# Altium PCB NB2DSK01.PcbDoc (part 5 of 17)
Units mil, origin at the board's own origin, x right, y up, seen from the top; angles counter-clockwise.
Board outline 11815 x 6500.03 mil, 8 copper layers (Top Layer, MidLayer1, MidLayer2, GND, PWR, MidLayer3, MidLayer4, Bottom Layer), stack 74.62 mil thick; 798 components, 1002 nets, 3927 pads, 3182 vias.
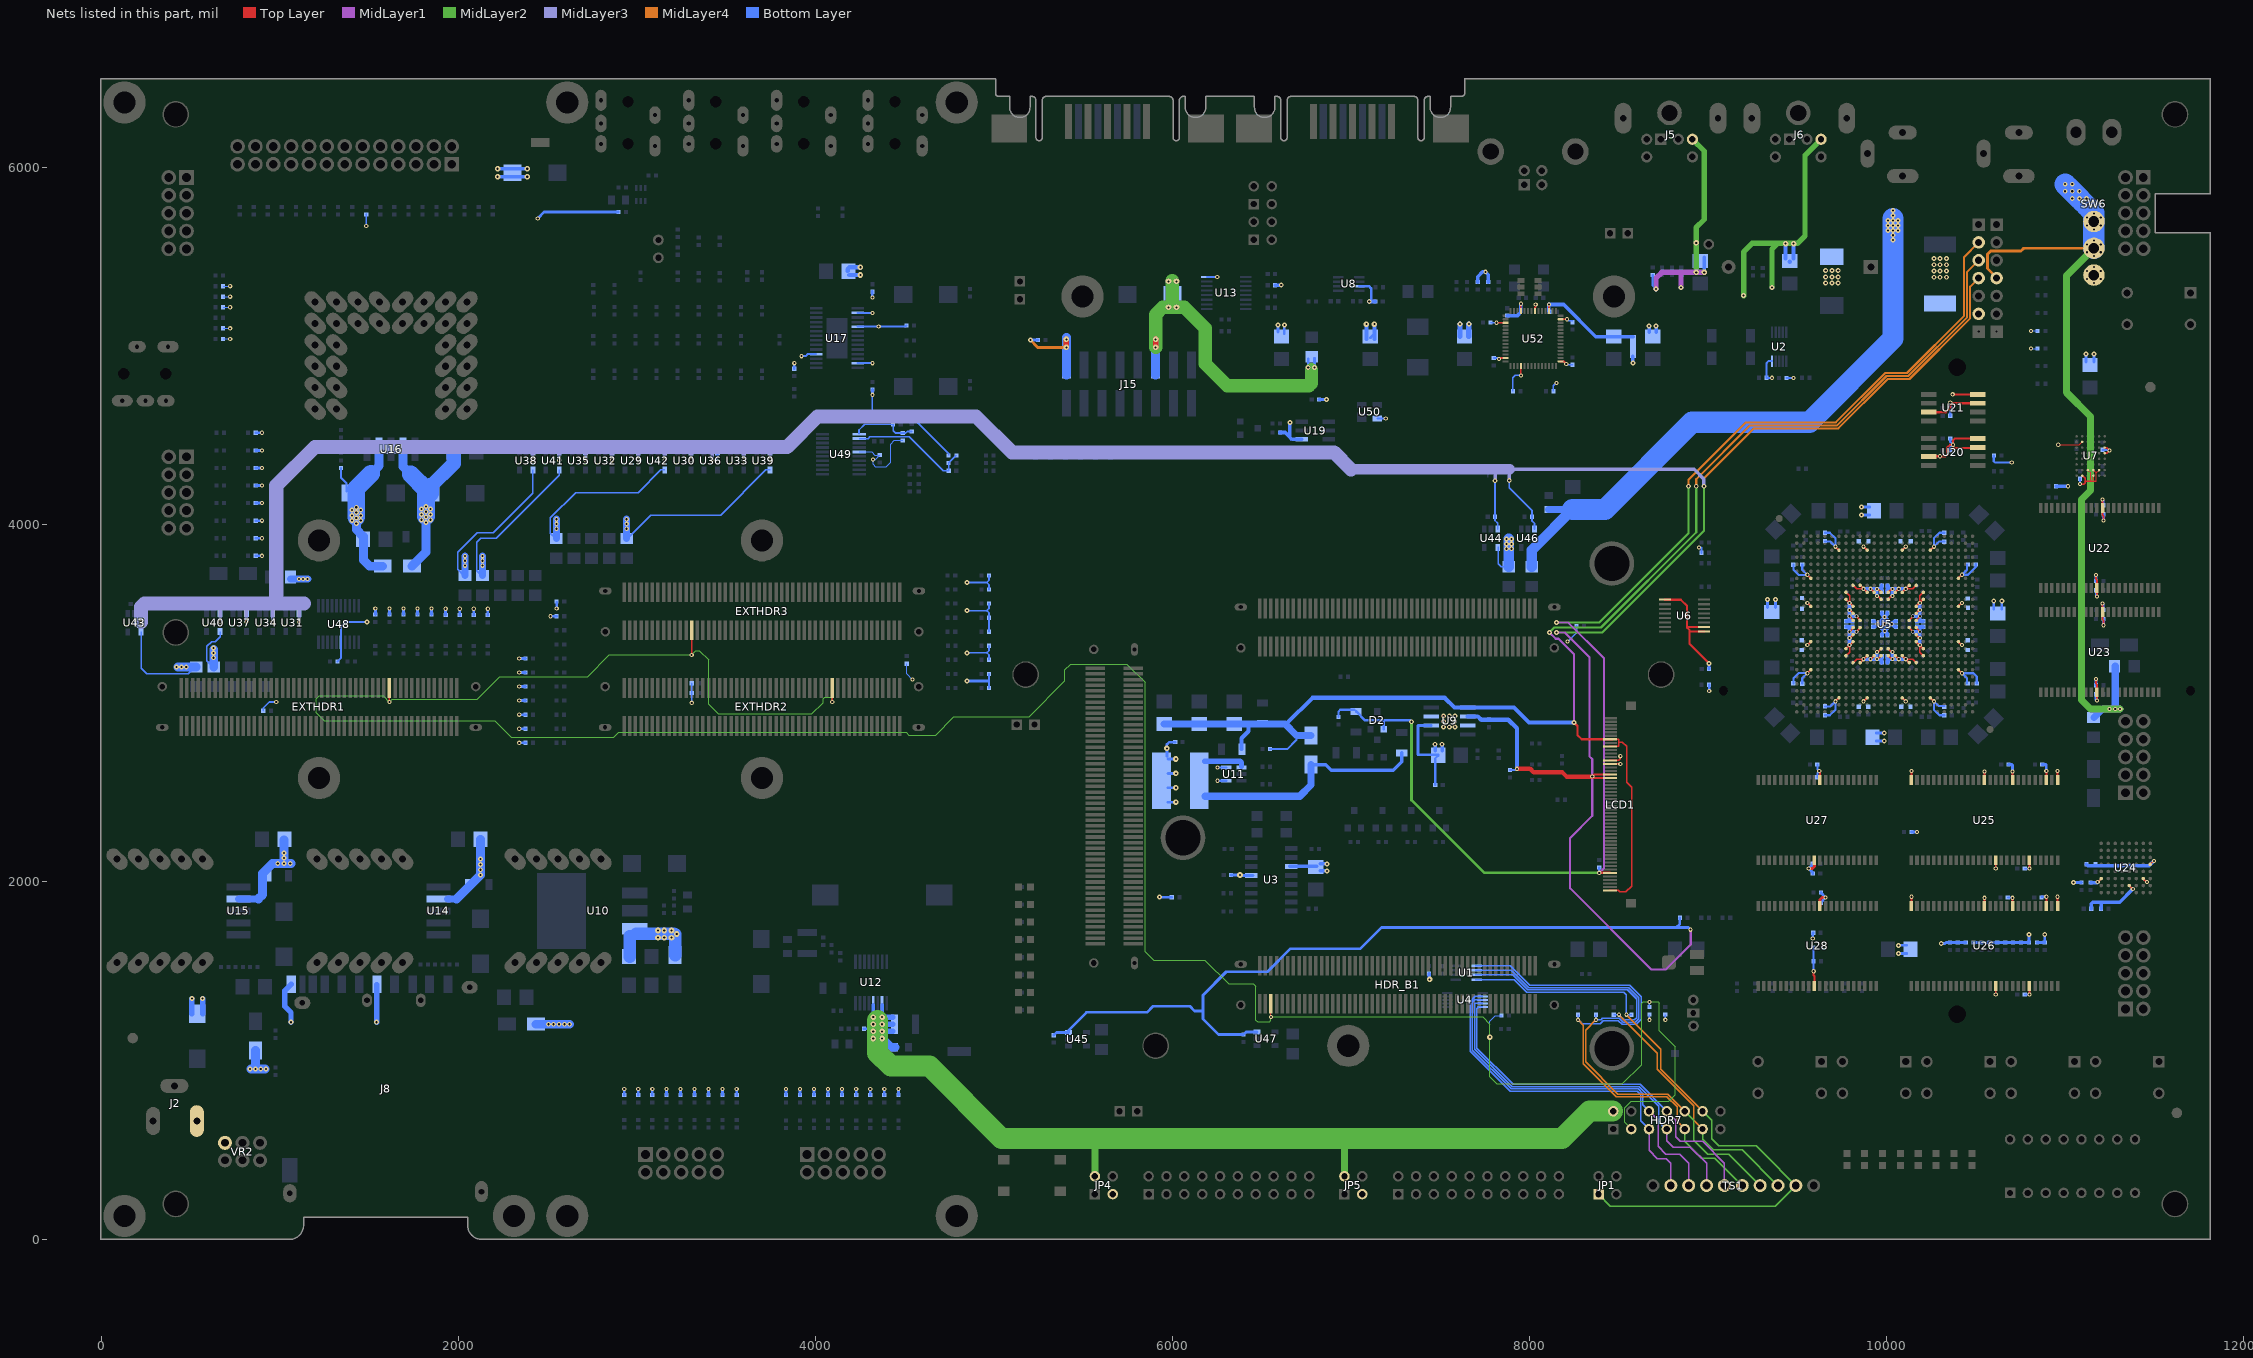
[diagram p11: the nets of this part, all layers, seen from the top]

## Via types
v1: diameter 23.62, hole 11.81, Top Layer to Bottom Layer, tented both sides, 1950 vias
v2: diameter 27.56, hole 11.81, Top Layer to Bottom Layer, tented both sides, 679 vias
v3: diameter 23.62, hole 11.81, Top Layer to Bottom Layer, 194 vias
v4: diameter 31.5, hole 11.81, Top Layer to Bottom Layer, tented both sides, 178 vias
v5: diameter 21.65, hole 11.81, Top Layer to Bottom Layer, tented both sides, 67 vias
v6: diameter 23.62, hole 11.81, Top Layer to Bottom Layer, tented bottom, 53 vias
v7: diameter 26, hole 11.81, Top Layer to Bottom Layer, tented both sides, 21 vias
v8: diameter 26, hole 11.81, Top Layer to Bottom Layer, 13 vias
v9: diameter 28, hole 11.81, Top Layer to Bottom Layer, 8 vias
v10: diameter 25.59, hole 11.81, Top Layer to Bottom Layer, tented both sides, 7 vias
v11: diameter 39.37, hole 11.81, Top Layer to Bottom Layer, tented both sides, 5 vias
v12: diameter 30, hole 11.81, Top Layer to Bottom Layer, 3 vias
v13: diameter 30, hole 11.81, Top Layer to Bottom Layer, tented both sides, 2 vias
v14: diameter 23, hole 11.81, Top Layer to Bottom Layer, tented both sides, 1 vias
v15: diameter 26.56, hole 11.81, Top Layer to Bottom Layer, tented both sides, 1 vias

## Nets (pads, with @x,y where several pads share a name; then routed paths per layer and width w, separated by ;. In a path a pad name is that pad's centre, name@x,y a point inside that pad or via, vN(x,y) a via of type N, cw(c..) or ccw(c..) an arc to the next point about the centre after c; other vN are vias at no path point) (continued)
3V3: C10.1 C11.1 C14.1 C15.1 C54.1 C55.1 C56.1 C57.1 C58.1 C59.1 C60.1 C61.1 C62.1 C63.1 C64.1 C65.1 C66.1 C67.1 C68.1 C69.1 C70.1 C71.1 C72.1 C73.1 C74.1 C75.1 C76.1 C77.1 C78.1 C79.1 C80.1 C81.1 C82.1 C83.1 C84.1 C85.1 C86.1 C87.1 C88.1 C89.1 C90.1 C91.1 C92.1 C93.1 C94.1 C95.1 C96.1 C97.1 C98.1 C99.1 C100.1 C101.1 C102.1 C103.1 C104.1 C105.1 C106.1 C107.1 C108.1 C109.1 C110.1 C111.1 C112.1 C113.1 C117.1 C121.1 C122.1 C123.1 C124.1 C125.1 C126.1 C154.1 C157.1 C158.1 C161.1 C162.1 C167.1 C168.1 C199.1 C200.2 C201.1 C202.2 C203.1 C204.1 C205.1 C206.1 C207.1 C208.1 C209.1 C210.1 C211.1 C212.1 C213.1 C214.1 C215.1 C216.1 C217.1 C218.1 C219.1 C220.1 C221.1 C222.1 C223.1 C224.1 C225.1 C226.1 C227.1 C228.1 C229.1 C230.1 C231.1 C232.1 C233.1 C234.1 C254.1 C255.1 C263.2 C264.2 C265.2 C266.1 C267.1 C268.1 D6.2 D7.2 D8.1 J8.4 J8.COM J15.16 JP4.3 JP5.3 LCD1.37 LCD1.38 NT5.1 R1.2 R6.1 R7.1 R10.2 R12.1 R18.2 R20.1 R34.2 R47.2 R52.1 R79.2 R135.2 R137.2 R142.2 R143.2 R144.2 R145.2 R146.2 R147.2 R148.2 R149.2 R150.2 R151.2 R152.2 R153.1 R154.1 R155.2 R156.1 R157.2 R158.1 R159.1 R160.2 R171.1 R172.1 R173.1 R177.1 R183.2 R190.2 R191.2 R192.2 R193.2 R198.2 R199.2 R200.2 R201.2 R206.2 R208.2 R209.2 R210.2 R211.2 R216.2 R217.2 R218.2 R219.2 R224.2 R226.2 R227.2 R228.2 R229.2 R234.2 R235.2 R236.2 R237.2 R242.2 R244.2 R245.2 R246.2 R247.2 R252.2 R253.2 R254.2 R255.2 R260.2 R262.2 R263.2 R264.2 R265.2 R270.2 R271.2 R272.2 R273.2 R278.2 R280.2 R281.2 R282.2 R283.2 R288.2 R289.2 R290.2 R291.2 R296.1 R297.2 R298.2 R299.2 R300.2 R303.1 R304.1 R314.2 R316.2 R318.1 R319.1 TP12.1 U2.10 U3.3 U3.13 U5.AD7 U5.AD11 U5.AD16 U5.AD20 U5.C7 U5.C11 U5.C16 U5.C20 U5.G3 U5.G24 U5.H9 U5.H10 U5.H17 U5.H18 U5.J8 U5.J11 U5.J12 U5.J13 U5.J14 U5.J15 U5.J16 U5.J19 U5.K8 U5.K13 U5.K14 U5.K19 U5.L3 U5.L9 U5.L18 U5.L24 U5.M9 U5.M18 U5.N9 U5.N10 U5.N17 U5.N18 U5.P9 U5.P10 U5.P17 U5.P18 U5.R9 U5.R18 U5.T3 U5.T9 U5.T18 U5.T24 U5.U8 U5.U13 U5.U14 U5.U19 U5.V8 U5.V11 U5.V12 U5.V13 U5.V14 U5.V15 U5.V16 U5.V19 U5.W9 U5.W10 U5.W17 U5.W18 U5.Y3 U5.Y24 U6.1 U6.9 U6.10 U7.B2 U7.C6 U7.D6 U7.G3 U7.G4 U7.G5 U7.H2 U7.H4 U8.3 U13.16 U14.2 U15.2 U16.4 U19.4 U20.3 U20.7 U20.8 U21.3 U21.7 U21.8 U22.11 U22.33 U23.11 U23.33 U24.D8 U24.F1 U24.F7 U24.G5 U25.1 U25.3 U25.9 U25.14 U25.27 U25.43 U25.49 U26.1 U26.3 U26.9 U26.14 U26.27 U26.43 U26.49 U27.11 U27.33 U28.11 U28.33 U38.4 U39.4 U40.4 U44.4 U48.15 U49.15 U50.4 U52.7 U52.11 U52.17 U52.27 U52.32 U52.43 U52.55 | length 26546.1
  Top Layer w5: v1(10960.63,4448.82) 11078.74,4448.82 U7.B2@11094.49,4464.57 ; U7.G3@11125.98,4307.09 11141.73,4291.34 11141.73,4244.1 ; 11157.48,4246.62 U7.H4@11157.48,4275.59 ; U7.G4@11157.48,4307.09 11173.23,4291.34 ; 11173.23,4244.1 11173.23,4291.34 ; U7.G5@11188.98,4307.09 11173.23,4291.34
  Top Layer w7.87: v1(7950.79,4836.61) U52.32@7950.79,4885.24 ; U52.55@8177.76,5151.57 v1(8208.68,5151.57) ; LCD1.37@8448.82,2661.42 v1(8507.87,2661.42) ; LCD1.38@8448.82,2681.1 8500,2681.1 8507.87,2688.98 v1(8507.87,2704.73) ; 8803.15,3581.06 8846.46,3581.06 ; v1(9555.12,3169.29) U5.Y3@9574.8,3188.98 ; v1(9555.12,3326.77) U5.T3@9574.8,3346.46 ; v1(9555.12,3562.99) U5.L3@9574.8,3543.31 ; v1(9555.12,3720.47) U5.G3@9574.8,3700.79 ; v1(9712.6,3011.81) U5.AD7@9732.28,3031.5 ; v1(9712.6,3877.95) U5.C7@9732.28,3858.27 ; U5.V8@9771.65,3267.72 9791.34,3287.4 v1(9791.34,3326.77) ; U5.U8@9771.65,3307.09 v1(9791.34,3326.77) ; U5.K8@9771.65,3582.68 v1(9791.34,3562.99) ; U5.J8@9771.65,3622.05 9791.34,3602.36 v1(9791.34,3562.99) ; v1(9791.34,3366.14) U5.R9@9811.02,3385.83 ; v5@9791.34,3402.76 U5.P9@9811.02,3425.2 ; v5@9791.34,3487.01 U5.N9@9811.02,3464.57 ; v1(9791.34,3523.62) U5.M9@9811.02,3503.94 ; U5.W9@9811.02,3228.35 9830.71,3248.03 v1(9870.08,3248.03) ; U5.T9@9811.02,3346.46 v1(9791.34,3326.77) ; U5.L9@9811.02,3543.31 v1(9791.34,3562.99) ; U5.H9@9811.02,3661.42 9830.71,3641.73 v1(9870.08,3641.73) ; v5@9830.71,3403.15 U5.P10@9850.39,3425.2 ; v5@9830.71,3486.62 U5.N10@9850.39,3464.57 ; U5.W10@9850.39,3228.35 v1(9870.08,3248.03) ; U5.H10@9850.39,3661.42 v1(9870.08,3641.73) ; v1(9870.08,3011.81) U5.AD11@9889.76,3031.5 ; v1(9870.08,3877.95) U5.C11@9889.76,3858.27 ; U5.V11@9889.76,3267.72 v1(9870.08,3248.03) ; U5.J11@9889.76,3622.05 v1(9870.08,3641.73) ; v1(9909.45,3248.03) U5.V12@9929.13,3267.72 ; v1(9909.45,3641.73) U5.J12@9929.13,3622.05 ; v5@9948.82,3248.03 U5.V13@9968.5,3267.72 ; v5@9948.82,3287.4 U5.U13@9968.5,3307.09 ; v5@9948.82,3602.36 U5.K13@9968.5,3582.68 ; v5@9948.82,3641.73 U5.J13@9968.5,3622.05 ; U5.V14@10007.87,3267.72 v5@10027.56,3248.03 ; U5.U14@10007.87,3307.09 v5@10027.56,3287.4 ; U5.K14@10007.87,3582.68 v5@10027.56,3602.36 ; U5.J14@10007.87,3622.05 v5@10027.56,3641.73 ; U5.V15@10047.24,3267.72 v1(10066.93,3248.03) ; U5.J15@10047.24,3622.05 v1(10066.93,3641.73) ; U5.AD16@10086.61,3031.5 v1(10106.3,3011.81) ; U5.V16@10086.61,3267.72 v1(10106.3,3248.03) ; U5.J16@10086.61,3622.05 v1(10106.3,3641.73) ; U5.C16@10086.61,3858.27 v1(10106.3,3877.95) ; U5.W17@10125.98,3228.35 v1(10106.3,3248.03) ; U5.P17@10125.98,3425.2 v5@10145.67,3405.51 ; U5.N17@10125.98,3464.57 v5@10145.67,3484.25 ; U5.H17@10125.98,3661.42 v1(10106.3,3641.73) ; U5.W18@10165.35,3228.35 10145.67,3248.03 v1(10106.3,3248.03) ; U5.T18@10165.35,3346.46 v1(10185.04,3326.77) ; U5.R18@10165.35,3385.83 v1(10185.04,3366.14) ; U5.P18@10165.35,3425.2 v5@10185.04,3405.51 ; U5.N18@10165.35,3464.57 v5@10185.04,3485.83 ; U5.M18@10165.35,3503.94 v1(10185.04,3523.62) ; U5.L18@10165.35,3543.31 v1(10185.04,3562.99) ; U5.H18@10165.35,3661.42 10145.67,3641.73 v1(10106.3,3641.73) ; U5.V19@10204.72,3267.72 10185.04,3287.4 v1(10185.04,3326.77) ; U5.U19@10204.72,3307.09 v1(10185.04,3326.77) ; U5.K19@10204.72,3582.68 v1(10185.04,3562.99) ; U5.J19@10204.72,3622.05 10185.04,3602.36 v1(10185.04,3562.99) ; U5.AD20@10244.09,3031.5 v1(10263.78,3011.81) ; U5.C20@10244.09,3858.27 v1(10263.78,3877.95) ; U5.Y24@10401.58,3188.98 v1(10421.26,3169.29) ; U5.T24@10401.58,3346.46 v1(10421.26,3326.77) ; U5.L24@10401.58,3543.31 v1(10421.26,3562.99) ; U5.G24@10401.58,3700.79 v1(10421.26,3720.47) ; v1(11082.68,4228.35) 11102.36,4228.35 11110.24,4236.22 11110.24,4240.24 11110.24,4259.84 U7.H2@11094.49,4275.59 ; v1(11181.1,1999.82) U24.F1@11200.79,2019.51 ; U7.D6@11220.47,4401.58 11232.28,4401.58 v1(11248.03,4417.32) 11232.28,4433.07 U7.C6@11220.47,4433.07 ; U24.G5@11358.27,1980.14 v1(11377.95,1960.45) ; U24.F7@11437.01,2019.51 v1(11456.69,1999.82) ; U24.D8@11476.38,2098.25 v1(11496.06,2117.93)
  Top Layer w8: 11110,4240 11110.24,4240.24 11114.1,4244.1 11141.73,4244.1 11173.23,4244.1
  Top Layer w9.84: U52.11@7950.79,5193.9 U52.11@7950.78,5197.78 v1(7950.79,5238.19) ; U52.43@8173.01,4915.5 U52.43@8174.01,4915.5 8190.8,4915.5 v1(8204.72,4901.58) ; U26.14@10547.25,1866.14 v1(10547.24,1911.42) ; U25.14@10547.25,2570.87 v1(10547.24,2618.11) ; v1(10610.24,1370.08) U26.43@10610.24,1417.32 ; v1(10610.24,2074.8) U25.43@10610.24,2122.05 ; U26.9@10704.73,1866.14 v1(10704.72,1911.42) ; U25.9@10704.73,2570.87 v1(10704.72,2618.11) ; v1(10799.21,1370.08) U26.49@10799.21,1417.32 ; v1(10799.21,2074.8) U25.49@10799.21,2122.05 ; v1(11177.17,3015.75) U23.11@11177.17,3062.99 11177.17,3106.69 11172.24,3111.61 v1(11172.24,3136.81) v1@11177.17,3131.89 ; v1(11177.17,3598.43) U22.11@11177.17,3645.67 11177.17,3691.39 11172.24,3696.31 v1(11172.24,3719.49) v1@11177.17,3714.57 ; v1@11208.66,3442.91 v1(11213.58,3437.99) 11213.58,3463.86 11208.66,3468.78 U23.33@11208.66,3511.81 v1(11208.66,3559.06) ; v1(11208.66,4141.73) U22.33@11208.66,4094.49 11208.66,4054.11 11213.58,4049.19 v1(11213.58,4024.61)
  Top Layer w10: v1(7813.68,5131.89) U52.17@7861.61,5131.89 ; v1(7828.68,4928.45) 7835.41,4935.19 U52.27@7865.35,4935.19 ; U52.7@8029.52,5197.78 8029.52,5217.52 8033.68,5221.68 v1(8033.68,5233.45)
  Top Layer w11.81: v1(9590.55,1500.14) 9590.55,1477.45 9594.49,1473.51 U28.33@9594.49,1417.32 ; v1(9622.05,2622.05) 9625.98,2618.11 U27.11@9625.98,2570.87 ; U26.27@10137.8,1866.14 v1(10137.8,1917.32) ; U25.27@10137.8,2570.87 v1(10137.8,2622.05) ; U20.3@10208.66,4384.65 10234.25,4384.65 v1(10297.64,4384.65) 10328.65,4384.65 10339,4395 10339,4433 10354.82,4448.82 v1(10371.06,4448.82) ; U26.3@10893.7,1866.14 v1(10893.7,1917.32) ; U25.3@10893.7,2570.87 v1(10893.7,2622.05) ; U26.1@10956.69,1866.14 v1(10956.69,1917.32) ; U25.1@10956.69,2570.87 v1(10956.69,2622.05)
  Top Layer w12: U6.1@8757.87,3581.06 8846.46,3581.06 8881.89,3545.63 8881.89,3423.11 ; 8895,3410 8895,3333.51 v2(9004.92,3223.58) ; U6.9@8976.38,3401.93 8903.07,3401.93 8881.89,3423.11 ; U6.10@8976.38,3427.52 8886.3,3427.52 8881.89,3423.11 ; U21.3@10234.25,4631.1 10332.1,4631.1 10356,4655 v1@10356,4684.36 ; v1(10355.32,4685.04) v1@10356,4684.36 ; v1(10369.1,4731.1) U21.8@10509.84,4731.1 ; U20.8@10509.84,4483.07 10381.07,4483.07 10371.06,4473.06 v1(10371.06,4448.82) 10371.06,4439.94 10381,4430 10509.84,4430 U20.7@10510,4430 ; U21.7@10509.84,4681.1 10359.25,4681.1 v1@10356,4684.36
  Top Layer w15.75: v1(9562.99,2074.8) 9582.68,2074.8 9594.49,2086.62 U27.33@9594.49,2122.05 ; U28.11@9625.98,1866.14 9625.98,1901.57 9637.8,1913.39 v1(9657.48,1913.39)
  Top Layer w30: v4(5405.51,4994.27) v4(5405.51,5039.19)
  MidLayer1 w30: v4(5405.51,4994.27) v4(5405.51,5039.19)
  MidLayer2 w30: v4(5405.51,4994.27) v4(5405.51,5039.19)
  MidLayer4 w15.75: v2(5204.2,5035.42) 5245.35,4994.27 v4(5405.51,4994.27)
  MidLayer4 w30: v4(5405.51,4994.27) v4(5405.51,5039.19)
  MidLayer3 w30: v4(5405.51,4994.27) v4(5405.51,5039.19)
  Bottom Layer w5: R300.2@682.6,5041.73 v1(722.36,5041.73) ; R299.2@682.6,5100.79 v1(722.36,5100.79) ; R298.2@682.6,5218.9 v1(722.36,5218.9) ; R297.2@682.6,5277.95 v1(722.36,5277.95) ; R296.1@682.6,5337.01 v1(722.36,5337.01) ; v1(10808,4987.57) R304.1@10845.4,4987.57 ; v1(10808,5086) R303.1@10845.4,5086
  Bottom Layer w7: U49.15@4244.37,4408.46 4315.94,4408.46 4333.66,4390.75 C254.1@4360.24,4390.75 4335.63,4366.14 v1(4322.83,4366.14) 4322.83,4338.58 4334.65,4326.77 4397.64,4326.77 4421.26,4350.39 4421.26,4452.76 4441.12,4472.62 R183.2@4489.11,4472.62 ; R144.2@4511.81,3222.3 4511.81,3165.35 v1(4543.31,3133.86)
  Bottom Layer w7.87: R173.1@625.98,3204.72 591.61,3239.09 591.61,3319.96 618.11,3346.46 637.8,3346.46 665.55,3374.21 U40.4@665.55,3401.94 ; U48.15@1342.4,3342.34 U48.15@1342.5,3342.24 ; R34.2@1482.28,5742.13 1484.25,5740.16 R34.2@1484.25,5738.66 v1@1484.25,5677.17 ; R171.1@2035.43,3712.6 2034.45,3713.58 1996.06,3751.97 1996.06,3846.46 2106.3,3956.69 2196.85,3956.69 2417.52,4177.36 U38.4@2417.52,4307.45 ; R172.1@2944.88,3921.26 3078.74,4055.12 3468.5,4055.12 3720.83,4307.45 U39.4@3746.26,4307.45 ; U44.4@7822.83,3877.95 7822.83,3874.38 7822.83,3783.46 7840.55,3765.75 R177.1@7883.86,3765.75 ; R316.2@7905.98,4748.03 7905.98,4823.31 7919.29,4836.61 v1(7950.79,4836.61) ; R314.2@8133.39,4748.03 8133.39,4779.05 v1(8149.61,4795.28) ; v1(8670.97,1228.01) R6.1@8670.97,1256.86 ; v1(8759.97,1228.01) R7.1@8759.97,1256.86 ; v5@10145.67,3404.33 v5@10145.67,3405.51 ; C95.1@10166.34,3429.13 C95.1@10169.29,3429.13 10203.69,3429.13 C58.1@10204.01,3429.45
  Bottom Layer w9.84: R142.2@907.5,2958.45 907.5,2974.43 940.94,3007.87 v1(980.32,3007.87) ; v1(3307.5,3003.45) R20.1@3307.5,3058.45 R143.2@3307.5,3113.45 ; v2(4849.58,3283.44) 4959.61,3283.44 ; v2(4849.58,3519.66) 4959.61,3519.66 ; v2(4849.58,3677.14) 4959.61,3677.14 ; R209.2@4971.97,3086.61 R208.2@4971.97,3165.35 ; R211.2@4971.97,3244.1 4971.97,3271.13 4959.64,3283.47 4971.97,3295.8 R210.2@4971.97,3322.84 ; R216.2@4971.97,3401.58 R217.2@4971.97,3480.32 4971.97,3507.35 4959.64,3519.69 4971.97,3532.02 R219.2@4971.97,3559.06 ; R218.2@4971.97,3637.8 4971.97,3664.83 4959.64,3677.17 4971.97,3689.5 R224.2@4971.97,3716.54 ; v1(8204.72,4901.58) 8209.65,4896.65 C264.2@8240.16,4896.65 ; v1(8208.68,5151.57) 8217.54,5142.72 C265.2@8240.16,5142.72 ; v1(8212.6,3346.46) 8262.5,3396.36 R18.2@8262.5,3433.45 ; v1@10355.32,4684.06 v1(10355.32,4685.04) ; C222.1@10772.64,1370.08 v1(10799.21,1370.08) ; C220.1@10772.64,2074.8 v1(10799.21,2074.8) ; v1(11208.66,4141.73) 11213.58,4136.81 C207.1@11213.58,4110.24
  Bottom Layer w10: C267.1@7782.48,5131.89 v1(7813.68,5131.89) ; C268.1@7799.21,4934.06 7823.08,4934.06 v1(7828.68,4928.45)
  Bottom Layer w11.81: U50.4@7146.86,4596.13 v1(7194.1,4596.13) ; v1(8949,3872.8) 8960,3872.8 8962.1,3870.7 R159.1@8962.1,3843.38 ; v1(9356.91,4823.54) C11.1@9326.4,4823.54 ; U2.10@9358.29,4916.76 9336.99,4916.76 9326.4,4906.17 ; R1.2@9438.61,4823 R1.2@9439.13,4823 v1(9477,4823) ; C233.1@9589.57,1631.93 C229.1@9589.57,1556.18 ; v1(9590.55,1500.14) 9589.57,1501.13 C229.1@9589.57,1556.18 ; C229.1@9590.55,1555.19 C229.1@9589.57,1556.18 ; C232.1@9611.22,2586.61 9611.22,2609.25 9622.05,2620.08 v1(9622.05,2622.05) 9611.22,2632.87 C228.1@9611.22,2657.48 ; C199.1@10355.32,4417.32 10355.32,4435.04 10369.09,4448.82 v1(10371.06,4448.82) 10355.32,4464.57 C202.2@10355.32,4484.25 ; C200.2@10355.29,4611.45 C201.1@10355.32,4654.74 v1(10355.32,4685.04) ; C221.1@10678.15,1913.39 v1@10702.76,1913.39 ; C225.1@10866.14,1917.32 10867.13,1917.32 v1(10893.7,1917.32) ; v1(11082.68,4228.35) C121.1@11082.68,4258.86 ; C204.1@11172.24,3633.86 11172.24,3603.35 v1(11177.17,3598.43) ; v1(11208.66,3559.06) 11213.58,3554.13 C208.1@11213.58,3523.62 ; C122.1@11208.66,4420.28 11245.08,4420.28 v1(11248.03,4417.32) ; C11.1@9326.4,4823.54 9326.4,4906.17 ; C11.1@9326.4,4823.54 9326.4,4906.17
  Bottom Layer w12: C255.1@1322.76,3234.1 1342.5,3253.83 U48.15@1342.5,3342.24 1342.5,3429.5 1370,3457 v2(1489,3457) ; R79.2@1343.68,4318.67 1343.68,4262.92 1374.7,4231.9 C168.1@1374.7,4188.5 ; U13.16@6192.59,5388.78 v1(6250.66,5388.78) ; C75.1@9476.76,3113.03 9476.77,3139.94 9508.08,3171.26 v1@9555.12,3171.26 ; C106.1@9476.76,3776.74 9476.76,3749.83 9508.08,3718.51 v1@9555.12,3718.51 ; C98.1@9526.97,3110.91 9526.97,3141.14 v1(9555.12,3169.29) ; C80.1@9526.97,3778.86 9526.97,3748.62 v1(9555.12,3720.47) ; C81.1@9654.21,2983.66 9684.45,2983.66 v1(9712.6,3011.81) 9712.6,2964.77 9681.28,2933.45 C99.1@9654.37,2933.45 ; C78.1@9654.21,3906.1 9654.35,3906.1 9684.45,3906.1 v1(9712.6,3877.95) 9712.6,3925 9681.28,3956.31 C89.1@9654.37,3956.31 ; C88.1@10322.01,2933.45 10295.1,2933.45 10263.78,2964.77 v1(10263.78,3011.81) 10290.75,2984.84 10322.01,2984.84 C70.1@10322.17,2984.84 ; C87.1@10322.01,3956.31 10295.1,3956.31 10263.78,3925 v1(10263.78,3877.95) 10291.93,3906.1 C79.1@10322.17,3906.1 ; C69.1@10449.41,3110.91 10449.41,3111.12 10449.41,3141.14 v1(10421.26,3169.29) 10485.57,3169.29 10503.94,3150.92 C108.1@10503.94,3111.22 ; C73.1@10449.41,3778.86 10449.41,3778.78 10449.41,3748.62 v1(10421.26,3720.47) 10454.72,3720.47 10498.68,3764.43 C101.1@10498.68,3778.78 C101.1@10498.68,3779.25 ; R52.1@10599.28,4388.25 10599.28,4356.72 10606,4350 v1(10700,4350)
  Bottom Layer w14: U8.3@7045.11,5336.69 7099.93,5336.69 7112.33,5324.29 7112.33,5261.76 v2(7101.62,5251.06)
  Bottom Layer w15: v2(4849.58,3125.96) 4969.46,3125.96
  Bottom Layer w15.75: R290.2@865.67,3826.77 v1(900.12,3826.77) ; R291.2@865.67,3925.2 v1(900.12,3925.2) ; R289.2@865.67,4023.62 v1(900.12,4023.62) ; R288.2@865.67,4122.05 v1(900.12,4122.05) ; R283.2@865.67,4220.47 v1(900.12,4220.47) ; R282.2@865.67,4318.9 v1(900.12,4318.9) ; R280.2@865.67,4417.32 v1(900.12,4417.32) ; R281.2@865.67,4515.75 v1(900.12,4515.75) ; R206.2@1535.43,3497.56 v1(1535.43,3532.01) ; R200.2@1614.17,3497.56 v1(1614.17,3532.01) ; R201.2@1692.91,3497.56 v1(1692.91,3532.01) ; R199.2@1771.65,3497.56 v1(1771.65,3532.01) ; R198.2@1850.39,3497.56 v1(1850.39,3532.01) ; R192.2@1929.13,3495.59 v1(1929.13,3530.04) ; R193.2@2007.87,3495.59 v1(2007.87,3530.04) ; R190.2@2086.61,3495.59 v1(2086.61,3530.04) ; R191.2@2165.35,3495.59 v1(2165.35,3530.04) ; v1(2341.61,2779.53) R242.2@2376.06,2779.53 ; v1(2341.61,2858.27) R236.2@2376.06,2858.27 ; v1(2341.61,2937.01) R237.2@2376.06,2937.01 ; v1(2341.61,3015.75) R235.2@2376.06,3015.75 ; v1(2341.61,3094.49) R234.2@2376.06,3094.49 ; v1(2341.61,3173.23) R228.2@2376.06,3173.23 ; v1(2341.61,3251.97) R229.2@2376.06,3251.97 ; v1(2444.88,5716.54) 2480.32,5751.97 R135.2@2896.14,5751.97 ; v1(2516.42,3488.19) R227.2@2550.87,3488.19 ; v1(2550.87,3532.48) R226.2@2550.87,3566.93 ; R245.2@2929.13,806.61 v1(2929.13,841.06) ; R244.2@3007.87,806.61 v1(3007.87,841.06) ; R247.2@3086.61,806.61 v1(3086.61,841.06) ; R246.2@3165.35,806.61 v1(3165.35,841.06) ; R252.2@3244.09,806.61 v1(3244.09,841.06) ; R253.2@3322.83,806.61 v1(3322.83,841.06) ; R255.2@3401.57,806.61 v1(3401.57,841.06) ; R254.2@3480.32,806.61 v1(3480.32,841.06) ; R260.2@3559.06,806.61 v1(3559.06,841.06) ; R263.2@3834.65,806.61 v1(3834.65,841.06) ; R262.2@3913.39,806.61 v1(3913.39,841.06) ; R265.2@3992.13,806.61 v1(3992.13,841.06) ; R264.2@4070.87,806.61 v1(4070.87,841.06) ; R270.2@4149.61,806.61 v1(4149.61,841.06) ; R271.2@4228.35,806.61 v1(4228.35,841.06) ; R273.2@4307.09,806.61 v1(4307.09,841.06) ; R272.2@4385.83,806.61 v1(4385.83,841.06) ; R278.2@4464.57,806.61 v1(4464.57,841.06) ; v2@5200.26,5035.42 v2(5204.2,5035.42) R137.2@5246.52,5035.42 ; v2(5927.84,1915) R158.1@5995.64,1915 ; C14.1@6327.76,2039.37 v4@6374.02,2039.37 ; v4(6377.95,2039.37) v4@6374.02,2039.37 ; U3.13@6450.79,2037.01 U3.13@6440.95,2037.01 6377.95,2037.01 6376.38,2037.01 6375.98,2037.4 v4@6374.02,2039.37 ; C123.1@6590.61,5079.36 v2(6590.61,5118.73) ; C123.1@6626.05,5071.48 v2(6626.05,5118.73) ; C125.1@6820.68,4702 v2(6863,4702) ; C124.1@7107.83,5047.86 7111.76,5051.8 C124.1@7127.51,5067.55 ; C117.1@9004.92,3192.91 v2(9004.92,3223.58) ; v1(9005.4,3070.4) R47.2@9005.4,3104.85 ; C57.1@9332.73,3536.55 v2(9332.73,3581.55) ; C57.1@9377.73,3536.55 v2(9377.73,3581.55) ; v1(9585.33,1683.84) 9585.33,1712.38 C226.1@9588.28,1715.33 ; C231.1@9585.63,2047.24 9585.63,2052.17 v1(9562.99,2074.8) 9585.63,2097.44 C227.1@9585.63,2102.36 ; C234.1@9630.91,1881.89 9630.91,1886.81 v1(9657.48,1913.39) 9630.91,1939.96 C230.1@9630.91,1940.95 ; v2(9859.48,4055.87) C56.1@9904.48,4055.87 ; v2(9859.48,4100.87) C56.1@9904.48,4100.87 ; C54.1@9941,2788.98 v2(9986,2788.98) ; C54.1@9941,2833.98 v2(9986,2833.98) ; v2(10066.54,1600.28) C218.1@10111.54,1600.28 ; v2(10066.54,1645.28) C218.1@10111.54,1645.28 ; C224.1@10138.89,2280.7 v1(10169.4,2280.7) ; v2(10305,1655) 10327,1655 10332.48,1660.48 R153.1@10353.41,1660.48 R155.2@10441.99,1660.48 ; R145.2@10486.28,1660.48 R146.2@10530.57,1660.48 R147.2@10574.86,1660.48 R148.2@10619.15,1660.48 R149.2@10663.44,1660.48 R150.2@10707.73,1660.48 R151.2@10752.03,1660.48 R152.2@10796.32,1660.48 v2(10796.32,1706.14) ; C55.1@10599.19,3528.68 v2(10599.19,3573.68) ; C55.1@10644.19,3528.68 v2(10644.19,3573.68) ; C219.1@10682.09,2656.5 C219.1@10682.09,2657.48 10701.48,2657.48 10704.72,2654.24 v1(10704.72,2618.11) ; R156.1@10840.61,1660.48 R157.2@10884.9,1660.48 v2(10884.9,1706.14) ; C223.1@10871.06,2657.48 10890.46,2657.48 10893.7,2654.24 v1(10893.7,2622.05) ; v2(11044.88,1996.87) C212.1@11090.55,1996.87 ; C217.1@11116,4913 v2(11116,4958) ; C217.1@11161,4913 v2(11161,4958) ; C210.1@11172.24,3102.36 v1(11172.24,3136.81) ; C209.1@11172.24,3685.04 v1(11172.24,3719.49) ; C206.1@11173.23,3050.2 C206.1@11172.24,3051.18 11172.24,3020.67 v1(11177.17,3015.75) ; v1(11213.58,3437.99) C205.1@11213.58,3472.44 ; v1(11213.58,4024.61) C203.1@11213.58,4059.06
  Bottom Layer w19.68: U3.3@6655.51,2087.01 U3.3@6665.35,2087.01 6801.5,2087.01 C15.1@6808.66,2087.01 ; C15.1@6828.7,2061.9 v2(6864.13,2061.9) ; C15.1@6828.7,2101.27 v2(6864.13,2101.27) ; v2(8578,4907.57) NT5.1@8578,4943 ; C10.1@8668.93,5079 v2(8668.93,5114.43) ; C10.1@8708.3,5079 v2(8708.3,5114.43) ; R12.1@10948.35,4216.54 v1(11015.75,4216.54) ; C215.1@11141.73,1996.87 11178.15,1996.87 v1(11181.1,1999.82) ; C216.1@11144.78,1850.28 11144.78,1877.28 11154,1886.5 11206.6,1886.5 ; C213.1@11199.85,1850.28 11199.85,1879.75 11206.6,1886.5 ; v1(11377.95,1960.45) 11304,1886.5 11206.6,1886.5
  Bottom Layer w20: C154.1@6574.48,5342.52 v2(6608.93,5342.52) ; R160.2@6601.98,4517.47 6630.53,4517.47 6657,4491 ; v2(6657,4573) 6657,4491 ; U19.4@6724.27,4478.53 6669.47,4478.53 6657,4491 ; v2(7101.62,5251.06) C126.1@7136.07,5251.06 ; R10.2@7436.99,1486.69 7436.99,1459.99 v13(7440,1455) ; R319.1@7708.78,5359.75 7708.78,5389.78 7736.32,5417.32 v1(7751.97,5417.32) 7767.9,5401.39 R318.1@7767.9,5359.75 ; C263.2@7874,5172.23 7932.23,5172.23 7950.79,5190.79 v1(7950.79,5238.19) ; C59.1@9772.64,3460.63 9773.35,3460.63 C105.1@9808.07,3460.63 ; C61.1@9773.03,3429.13 9773.35,3429.13 C85.1@9808.07,3429.14 ; v1(9791.34,3326.77) v1(9791.34,3366.14) v5(9791.34,3401.58) ; 9791.34,3428.8 v5(9791.34,3401.58) ; 9791.34,3461.11 v5(9791.34,3488.19) ; v1(9791.34,3562.99) v1(9791.34,3523.62) v5(9791.34,3488.19) ; v5(9830.71,3401.58) v5(9791.34,3401.58) ; v5(9830.71,3488.19) v5(9791.34,3488.19) ; v1(9870.08,3248.03) v1(9909.45,3248.03) v5(9944.88,3248.03) ; v1(9870.08,3641.73) v1(9909.45,3641.73) v5(9944.88,3641.73) ; C107.1@9924.54,3429.45 9933.68,3429.45 v5(9948.68,3444.45) ; C64.1@9924.54,3460.45 9932.68,3460.45 v5(9948.68,3444.45) ; v5(9944.88,3287.4) v5(9944.88,3248.03) ; v5(9944.88,3602.36) v5(9944.88,3641.73) ; 9971.86,3248.03 v5(9944.88,3248.03) ; 9972.16,3641.73 v5(9944.88,3641.73) ; C68.1@9972.44,3229.33 C100.1@9972.44,3264.76 C100.1@9972.44,3266.73 ; C86.1@9972.44,3623.03 C86.1@9972.44,3625 C60.1@9972.44,3660.43 ; C62.1@9972.68,3389.45 C62.1@9973.68,3390.45 ; C92.1@9972.68,3507.59 9972.68,3498.45 v5(9987.68,3483.45) ; C62.1@9973.68,3381.31 C62.1@9973.68,3390.45 ; v5@9988.19,3405.94 v5(9988.19,3444.88) v5@9988.19,3445.45 ; C110.1@10003.68,3381.31 10003.68,3390.45 v5(9988.68,3405.45) ; C93.1@10003.68,3507.59 10003.68,3499.45 v5(9987.68,3483.45) ; C67.1@10003.94,3229.33 C104.1@10003.94,3264.76 C104.1@10003.94,3266.73 ; C94.1@10003.94,3623.03 C94.1@10003.94,3625 C66.1@10003.94,3660.43 ; 10004.22,3641.73 v5(10031.5,3641.73) ; 10004.36,3248.03 v5(10031.5,3248.03) ; v5(10031.5,3287.4) v5(10031.5,3248.03) ; v5(10031.5,3602.36) v5(10031.5,3641.73) ; C63.1@10051.82,3429.45 10043.68,3429.45 v5(10027.68,3445.45) ; C96.1@10051.82,3460.45 10042.68,3460.45 v5(10027.68,3445.45) ; v1(10106.3,3248.03) v1(10066.93,3248.03) v5(10031.5,3248.03) ; v1(10106.3,3641.73) v1(10066.93,3641.73) v5(10031.5,3641.73) ; v5(10145.67,3401.58) v5(10185.04,3401.58) ; v5(10145.67,3488.19) v5(10185.04,3488.19) ; C91.1@10166.34,3460.63 10166.52,3460.45 10169.29,3460.45 C65.1@10204.01,3460.45 ; v1(10185.04,3326.77) v1(10185.04,3366.14) v5(10185.04,3401.58) ; 10185.04,3428.81 v5(10185.04,3401.58) ; 10185.04,3461.09 v5(10185.04,3488.19) ; v1(10185.04,3562.99) v1(10185.04,3523.62) v5(10185.04,3488.19) ; C211.1@11118.11,2099.23 11126.84,2090.5 11169.29,2090.5 11468.63,2090.5 v1(11496.06,2117.93) ; v5(9948.68,3444.45) 9987.68,3405.45 v5(9988.68,3405.45) ; v5(9948.68,3444.45) v5@9949.68,3445.45 ; v5@9949.68,3445.45 v5@9988.19,3445.45 ; v5@9949.68,3445.45 v5(9987.68,3483.45) ; C62.1@9973.68,3390.45 v5(9988.68,3405.45) ; v5(9987.68,3483.45) 9988.19,3482.94 v5@9988.19,3445.45 ; v5(9987.68,3483.45) 9989.68,3483.45 v5(10027.68,3445.45) ; v5@9988.19,3445.45 v5(10027.68,3445.45) ; v5(9988.68,3405.45) 10027.68,3444.45 v5(10027.68,3445.45)
  Bottom Layer w22: C124.1@7085.37,5041.55 7085.37,5055.73 v4(7085.37,5124.62) ; C124.1@7130.28,5041.55 7130.28,5055.73 v4(7130.28,5124.62)
  Bottom Layer w22.05: C95.1@10169.29,3429.13 C58.1@10203.69,3429.13
  Bottom Layer w30: v2(1063.19,1214.76) 1063.19,1268.95 1028.68,1303.45 1028.68,1391.6 J8.COM@1064.74,1427.67 ; v2(1542.52,1214.76) J8.4@1542.52,1426.11 ; C266.1@7609.76,5054.63 7609.76,5055.73 v2(7609.76,5124.63) ; C266.1@7659.76,5054.63 7659.76,5055.73 v2(7659.76,5124.63)
  Bottom Layer w39.37: U15.2@768.68,1905.38 880.61,1905.38 ; U14.2@1939,1905.38 1990.61,1905.38 ; R171.1@2037.4,3716.54 v1(2037.4,3771.65) v1(2037.4,3799.21) v1(2037.4,3824.8) ; R172.1@2942.91,3923.23 v1(2942.91,3978.35) v1(2942.91,4005.91) v1(2942.91,4031.5)
  Bottom Layer w49.21: R173.1@629.92,3204.72 v2(629.92,3255.91) v2(629.92,3283.46) v2@629.92,3303.15
  Bottom Layer w50: v2@838.68,953.45 v2(863.68,953.45) ; D7.2@863.68,1056.76 v2(863.68,953.45) ; 880.61,1905.38 903.68,1928.45 903.68,2034.68 903.68,2048.45 912.47,2057.25 958.68,2103.45 v2(988.68,2103.45) v2(1023.68,2103.45) ; v2@918.68,953.45 v2(893.68,953.45) v2(863.68,953.45) ; C162.1@1023.68,2235.46 v2(1023.68,2163.45) v2(1023.68,2133.45) v2(1023.68,2103.45) ; v2@1063.68,2103.45 v2(1058.68,2103.45) v2(1023.68,2103.45) ; v2(1428.68,4038.45) 1428.68,4023.45 v2(1428.68,4008.45) 1428.68,3974.4 C167.1@1468.68,3934.4 ; C167.1@1469.63,3918.45 1469.63,3802.51 1503.68,3768.45 D8.1@1576.99,3768.45 ; 1511.18,4285.95 1556.75,4331.52 U16.4@1556.75,4423.45 ; 1990.61,1905.38 v2(2123.68,2038.45) v2(2123.68,2068.45) v2(2123.68,2098.45) v2@2123.68,2123.45 ; C158.1@2122.74,2198.45 C158.1@2124.01,2238.45 v2(2123.68,2128.45) ; D6.2@2435.37,1203.45 v2(2505.68,1203.45) v2(2533.68,1203.45) v2(2563.68,1203.45) v2(2593.68,1203.45) v2(2623.68,1203.45) ; J15.16@5405.51,4838.98 v4@5405.51,5049.69
  Bottom Layer w59.06: R177.1@7883.86,3765.75 7883.86,3866.14 7883.86,3893.7 7883.86,3921.26 7883.86,3923.23
  Bottom Layer w100: v2@1428.68,4043.45 1428.68,4053.45 v2(1428.68,4068.45) 1428.68,4083.45 v2(1428.68,4098.45) 1428.68,4178.18 1428.68,4203.45 1511.18,4285.95
  other v1: 1484.25,5673.23
  other v2: 833.68,953.45 923.68,953.45 629.92,3311.02 7870.08,3866.14 7897.64,3866.14 7870.08,3893.7 7897.64,3893.7 7870.08,3921.26 7897.64,3921.26 1403.68,4023.45 1453.68,4023.45 1403.68,4053.45 1453.68,4053.45 1403.68,4083.45 1453.68,4083.45
3V3D: C260.2 R183.1 R188.2 U49.11 | length 371.9
  Bottom Layer w10: U49.11@4244.09,4511.81 4244.09,4531.5 4275.59,4562.99 R188.2@4435.51,4562.99 4435.51,4526.79 4447.32,4514.98 R183.1@4489.11,4514.98 4506.18,4514.98 4514.14,4522.94 C260.2@4538.92,4522.94
5V0: C1.1 C2.1 C3.1 C4.1 C135.1 C140.1 C141.1 C142.2 C146.2 C147.2 C165.1 C166.1 C169.1 C170.1 C193.1 C194.2 C195.2 C196.2 D4.2 D8.2 F2.1 F3.2 F4.2 F5.2 HDR7.2 J2.1 J5.4 J6.4 J15.6 JP4.2 JP5.2 L1.1 R66.2 R84.1 R85.1 R88.1 R89.1 R111.2 R174.1 R175.1 R176.1 R179.1 R182.2 SW6.1 SW6.2 TP1.1 U10.3 U11.4 U11.5 U12.2 U12.4 U16.2 U17.4 U17.16 U17.19 U17.27 U41.4 U42.4 U43.4 U46.4 VR2.3 | length 25873.9
  Top Layer w30: v4(5905.51,4994.27) v4(5905.51,5039.19)
  MidLayer1 w30: v4(5905.51,4994.27) v4(5905.51,5039.19) ; v2(8708,5321.7) 8708,5382.3 8740.22,5414.51 8847.7,5414.51 ; v2@8847.7,5330.77 8847.7,5414.51 ; v4(8977.7,5414.51) v4(8932.79,5414.52) 8847.7,5414.51
  MidLayer2 w30: v4(5905.51,4994.27) v4(5905.51,5039.19) ; J5.4@8911.42,6159.45 8978,6092.87 8978,5710.7 8932.79,5665.49 v4(8932.79,5579.33) v4(8932.79,5414.52) v4(8977.7,5414.51) ; v2(9198.54,5283.56) 9198.54,5528.44 9246.4,5576.3 9389,5576.3 ; v2(9357.32,5329.96) 9357.32,5544.62 9389,5576.3 ; J6.4@9631.89,6159.45 9542,6069.56 9542,5617.9 9500.4,5576.3 9478.64,5576.3 9433.72,5576.3 9389,5576.3
  MidLayer2 w39.37: JP4.2@5565.12,351.81 5565.12,545.12 ; JP5.2@6962.76,351.81 6962.76,557.24 ; SW6.2@11160.24,5549.13 11007.87,5396.77 11007.87,4740.16 11141.73,4606.3 11141.73,4192.91 11090.55,4141.73 11090.55,3019.68 11141.73,2968.5 v1(11248.03,2968.5) v1(11279.53,2968.5) v1(11307.09,2968.5)
  MidLayer2 w74.8: v4(5905.51,4994.27) 5905.51,5124.51 5905.51,5178.31 5945.2,5218 6065.1,5218 ; 5999,5369 5999,5363.65 5999,5218 6065.1,5218 ; 6778,4869 6778,4793 6764,4779 6307,4779 6182.8,4903.2 6182.8,5100.3 6065.1,5218
  MidLayer2 w118.11: 4348.68,1223.45 4348.68,1203.45 4348.68,1163.45 4348.68,1123.45 4348.68,1043.45 4423.63,968.5 4637.8,968.5 5043.31,562.99 8180.99,562.99 8334.54,716.54 HDR7.2@8464.64,716.54
  MidLayer4 w15.75: TP1.1@10614.94,5385.97 10565,5435.91 10565,5516 10582,5533 10751,5533 10767.13,5549.13 SW6.2@11160.24,5549.13
  MidLayer4 w30: v4(5905.51,4994.27) v4(5905.51,5039.19)
  MidLayer3 w30: v4(5905.51,4994.27) v4(5905.51,5039.19)
  Bottom Layer w7.87: U43.4@223.61,3400.9 223.61,3197.1 255.35,3165.35 488.19,3165.35 527.56,3204.72 529.53,3206.69 R176.1@531.5,3208.66 ; R174.1@2133.86,3712.6 2132.87,3713.58 2102.36,3744.09 2102.36,3901.57 2125.98,3925.2 2212.6,3925.2 2565.16,4277.76 U41.4@2565.16,4307.45 ; R175.1@2547.24,3921.26 2515.75,3952.76 2515.75,4039.37 2657.48,4181.1 3007.87,4181.1 3134.22,4307.45 U42.4@3155.71,4307.45 ; v1(4318.9,4728.35) 4318.9,4618.1 4349.7,4587.3 4557.8,4587.3 4745.8,4399.3 R182.2@4745.8,4389.29 ; R179.1@8011.81,3765.75 8011.81,3822.83 8027.76,3838.78 8027.76,3874.21 U46.4@8027.76,3874.38
  Bottom Layer w11.81: v1(3921.26,4944.88) 3944.88,4944.88 3956.69,4956.69 U17.4@4003.94,4956.69 ; U17.27@4236.22,4905.51 v1(4318.9,4905.51) ; U17.19@4236.22,5110.24 v1(4354.33,5110.24) 4503.17,5110.24 R111.2@4510.31,5117.37 ; U17.16@4236.22,5187.01 v1(4318.9,5187.01) ; v1(6251.97,2566.93) U11.4@6301.18,2566.93 ; v1(6251.97,2641.73) U11.5@6301.18,2641.73
  Bottom Layer w12: R84.1@8689.73,5399.33 8689.73,5339.97 v2(8708,5321.7) ; v2(8848.51,5329.96) R85.1@8848.51,5399.33 ; v2(9198.54,5283.56) R88.1@9198.54,5395.39 ; v2(9357.32,5329.96) R89.1@9357.32,5395.39
  Bottom Layer w14.17: v1(4318.9,5273.62) C196.2@4318.9,5306.1 C196.2@4318.9,5307.09 ; v4(5968.5,2748.03) 5968.5,2770.41 5981.56,2783.47 C141.1@6014.76,2783.47 6014.18,2782.88 C141.1@6003.35,2782.88
  Bottom Layer w15: R66.2@4271.86,1178.45 v4@4323.68,1178.45
  Bottom Layer w15.75: C194.2@3881.89,4875 v1(3881.89,4905.51) ; v1(4318.9,4728.35) C195.2@4318.9,4758.86 ; L1.1@5968.5,2704.73 v4(5968.5,2748.03) ; L1.1@5975.4,2446.93 v4(6018.71,2446.93) ; L1.1@5975.4,2527.66 v4(6018.71,2527.66) ; L1.1@5975.4,2608.4 v4(6018.71,2608.4) ; L1.1@5975.4,2689.14 v4(6018.71,2689.14) ; v2(6759.83,4881.88) F2.1@6759.83,4929.12 ; v2(6795.26,4881.88) F2.1@6795.26,4933.06
  Bottom Layer w20: v4@4324.18,1228.95 4324.18,1243.45 U12.4@4324.18,1313.45 ; v4@4373.68,1238.45 v4@4373.88,1238.65 ; v4(4373.68,1243.45) U12.2@4373.68,1313.45
  Bottom Layer w22: v4(2220.02,5949.69) 2303.07,5949.69 v4(2386.16,5949.69) ; v4(2220.02,5994.61) 2303.07,5994.61 v4(2386.16,5994.61) ; v4(5977.08,5218) 5977.08,5290.81 v4(5977.08,5363.65) ; v4(6022,5218) 6022,5290.81 v4(6022,5363.65) ; v4(8932.79,5414.52) 8932.79,5477.21 C169.1@8932.79,5497.59 ; C169.1@8932.79,5496.26 v4(8932.79,5579.33) ; v4(8977.7,5414.51) 8977.7,5477.21 C169.1@8977.7,5497.59 ; C170.1@9433.72,5492.33 v4(9433.72,5575.4) ; C170.1@9478.64,5492.33 v4(9478.64,5575.4)
  Bottom Layer w23.62: C193.1@4181.1,5421.26 4179.13,5423.23 4179.13,5431.1 4190.95,5442.91 v4(4251.97,5442.91) ; C193.1@4188.98,5399.61 v4(4251.97,5399.61)
  Bottom Layer w30: C2.1@507.93,1261.74 507.93,1262.81 v2(507.93,1346.74) ; C2.1@567.93,1261.74 567.93,1262.81 v2(567.93,1346.74) ; v4(4373.68,1163.45) C147.2@4433.68,1163.45 ; v4(4373.68,1203.45) C147.2@4433.68,1203.45 ; v4(4373.68,1243.45) C147.2@4433.68,1243.45
  Bottom Layer w39.37: F5.2@1060.28,3696.47 v1(1107.52,3696.47) v1(1131.14,3696.47) v1(1154.76,3696.47) v1@1158.7,3696.47 ; R174.1@2135.83,3716.54 v1(2135.83,3771.65) v1(2135.83,3799.21) v1(2135.83,3824.8) ; R175.1@2549.21,3923.23 v1(2549.21,3978.35) v1(2549.21,4005.91) v1(2549.21,4031.5) ; C142.2@8106.75,4086.61 C140.1@8236.22,4086.61 ; F4.2@11160.25,2921.25 11207.5,2968.5 v1(11248.03,2968.5) v1(11279.53,2968.5) ; F3.2@11279.53,3208.66 v1(11279.53,2968.5) ; v1(11307.09,2968.5) v1(11279.53,2968.5)
  Bottom Layer w49.21: v2@429.13,3204.72 v2(448.82,3204.72) v2(476.38,3204.72) 527.56,3204.72 R176.1@531.5,3204.72
  Bottom Layer w50: U16.2@1690.61,4423.45 1690.61,4326.52 1733.68,4283.45 ; D8.2@1740.37,3768.45 1818.68,3846.76 1818.68,3933.45 v2(1818.68,4013.45) ; v4(4373.68,1123.45) 4422.68,1074.45 C146.2@4443.31,1074.45 C146.2@4445.28,1074.45 ; J15.6@5905.51,4838.98 v4@5905.51,5049.69
  Bottom Layer w59.06: R179.1@8011.81,3765.75 8011.81,3822.83 8011.81,3858.27 8027.76,3874.21 8027.84,3874.3 C140.1@8240.16,4086.61
  Bottom Layer w70: C135.1@2960.63,1582.68 2960.63,1696.5 ; U10.3@2996.06,1709.45 3118.68,1709.45 3153.68,1709.45 3193.68,1709.45 3207.68,1709.45 ; D4.2@3213.72,1590.55 3213.72,1688.45 v4@3213.72,1708.41
  Bottom Layer w78.74: C3.1@1842.44,4212.52 1974.41,4344.49 C166.1@1974.41,4409.45
  Bottom Layer w100: 1733.68,4283.45 1818.68,4198.45 1818.68,4176.89 v2(1818.68,4103.45) 1818.68,4088.45 v2(1818.68,4073.45) 1818.68,4058.45 v2@1818.68,4048.45 ; C3.1@1842.44,4176.89 C3.1@1842.44,4212.52
  Bottom Layer w118.11: C140.1@8240.16,4086.61 8421.26,4086.61 8909.45,4574.8 9566.93,4574.8 10035.43,5043.31 v2(10035.43,5594.49) v2(10035.43,5622.05) v2(10035.43,5649.61) v2(10035.43,5677.17) v2(10035.43,5704.72) v2@10035.43,5716.54
  Bottom Layer w120: v7(10998.68,5908.45) 11018.68,5888.45 v7(11038.68,5868.45) 11058.68,5848.45 v2(11078.68,5828.45) 11098.68,5808.45 11118.68,5788.45 11138.68,5768.45 11160.24,5746.9 SW6.1@11160.24,5699.13 SW6.2@11160.24,5549.13
  other v2: 421.26,3204.72 1793.68,4028.45 1843.68,4028.45 1818.68,4043.45 1793.68,4058.45 1843.68,4058.45 1793.68,4088.45 1843.68,4088.45 10007.87,5649.61 10062.99,5649.61 10007.87,5677.17 10062.99,5677.17 10007.87,5704.72 10062.99,5704.72 10035.43,5732.28 10035.43,5759.84 11038.68,5828.45 11118.68,5828.45
  other v3: 11160.24,5504.89 11121.92,5527.01 11198.55,5527.01 11121.92,5571.26 11198.55,5571.26 11160.24,5593.38 11160.24,5654.89 11121.92,5677.01 11198.55,5677.01 11121.92,5721.26 11198.55,5721.26 11160.24,5743.38
  other v4: 4323.68,1123.45 4323.68,1163.45 4323.68,1203.45 4323.68,1243.45 3118.68,1688.45 3153.68,1688.45 3193.68,1688.45 3223.68,1708.45 3118.68,1728.45 3153.68,1728.45 3193.68,1728.45
  other v7: 10998.68,5868.45 11078.68,5868.45 11038.68,5908.45
5V0D: C259.2 R182.1 R187.2 U49.12 | length 728.4
  Bottom Layer w7.87: U49.12@4244.37,4483.46 4294.49,4483.46 4304.52,4493.5 4526.19,4493.5 4716.54,4303.15 C259.2@4747.05,4303.15 4747.05,4346.54 R182.1@4748.03,4347.52 ; C259.2@4748.03,4311.02 4748.03,4346.93 R182.1@4748.03,4347.52 ; R182.1@4748.03,4349.92 R182.1@4748.03,4347.52 ; R187.2@4789.8,4389.29 R182.1@4748.03,4347.52
5VUSW: D1.2 F1.2 SW6.3
  other v2: 9658,5354 9693,5354 9728,5354 10264,5387 10299,5387 10334,5387 9658,5389 9693,5389 9728,5389 10264,5422 10299,5422 10334,5422 9658,5424 9693,5424 9728,5424 10264,5457 10299,5457 10334,5457 10264,5492 10299,5492 10334,5492
  other v3: 11160.24,5354.89 11121.92,5377.01 11198.55,5377.01 11121.92,5421.26 11198.55,5421.26 11160.24,5443.38
9V0: C133.1 C134.1 C235.1 C236.1 C237.1 C238.1 C239.1 C240.1 C241.1 C242.1 C243.1 C244.1 C245.1 C246.1 C247.1 C248.1 C249.1 C250.1 C251.1 C252.1 C253.1 LCD1.33 LCD1.34 R41.2 R43.2 R57.2 TP6.1 U9.2 U9.3 U9.6 U9.7 U29.3 U30.3 U31.3 U32.3 U33.3 U34.3 U35.3 U36.3 U37.3 U38.3 U39.3 U40.3 U41.3 U42.3 U43.3 U44.3 U45.3 U46.3 U47.3 | length 25673
  Top Layer w10: LCD1.33@8448.82,2582.68 8358.27,2582.68 v1(8350.39,2590.55) 8362.21,2602.36 LCD1.34@8448.82,2602.36
  Top Layer w25: v1(7929.13,2633.86) 8003.27,2633.86 8023.68,2613.45 8183.68,2613.45 8206.58,2590.55 v1(8350.39,2590.55)
  MidLayer1 w11.81: v2(8149.61,3397.64) 8196.85,3397.64 8334.65,3259.84 8334.65,2704.73 8350.39,2688.98 8350.39,2370.26 8226.72,2246.59 8226.72,1965.28 8681.8,1510.2 8762.17,1510.2 8902,1650.04 v1@8902,1734
  MidLayer2 w11.81: v2(8149.61,3397.64) 8406.95,3397.64 8976.38,3967.06 v2(8976.38,4216.54)
  MidLayer4 w11.81: v2(8976.38,4216.54) 8976.38,4260.63 9108.19,4392.45 9256.12,4540.38 9728.93,4540.38 10005.32,4816.78 10127.4,4816.78 10467,5156.37 10467,5334.02 TP6.1@10514.94,5381.97
  MidLayer3 w19.68: v1(665.55,3456.69) 665.55,3555.32 ; v1(813.19,3456.69) 813.19,3556.89 ; v1(960.83,3456.69) 960.83,3551.38 ; v1@1110.24,3456.69 1110.24,3555.12 ; v1(2417.52,4362.2) 2417.52,4436.81 ; v1(2565.16,4362.2) 2565.16,4435.24 ; v1(2712.8,4362.2) 2712.8,4432.87 ; v1(2860.43,4362.2) 2860.43,4435.24 ; v1(3008.07,4362.2) 3008.07,4436.81 ; v1(3155.71,4362.2) 3155.71,4435.24 ; v1(3303.35,4362.2) 3303.35,4437.01 ; v1(3421.26,4362.2) 3421.26,4437.01 ; v1(3598.62,4362.2) 3598.62,4437.01 ; v1(3746.26,4362.2) 3746.26,4437.01 ; v2(7806.1,4247.05) 7806.1,4298.23 ; v2(7885.83,4248.03) 7885.83,4303.15 ; 7885.83,4311.02 8921.26,4311.02 8976.38,4255.91 v2(8976.38,4216.54)
  MidLayer3 w59.06: 7000,4311.02 7889.76,4311.02
  MidLayer3 w78.74: v1(223.61,3455.59) 223.61,3539.61 243.06,3559.06 1134.94,3559.06 ; 980.32,3559.06 980.32,4220.47 1196.85,4437.01 3842.01,4437.01 4012.76,4607.76 4899.24,4607.76 5100.43,4406.57 6904.45,4406.57 7000,4311.02
  Bottom Layer w10: C245.1@648.72,3553.15 665.35,3536.52 U40.3@665.35,3503.94 ; v1(665.55,3456.69) U40.3@665.55,3503.94 ; C242.1@796.36,3553.15 813.19,3536.32 U37.3@813.19,3503.94 v1(813.19,3456.69) ; C244.1@944,3553.15 960.83,3536.32 U34.3@960.83,3503.94 v1(960.83,3456.69) ; C236.1@1091.63,3553.15 1108.46,3536.32 U31.3@1108.46,3503.94 v1(1108.46,3456.69) ; C252.1@2400.69,4458.66 2417.52,4441.83 U38.3@2417.52,4409.45 v1(2417.52,4362.2) ; C250.1@2548.33,4458.66 2565.16,4441.83 U41.3@2565.16,4409.45 v1(2565.16,4362.2) ; C248.1@2695.96,4458.66 2712.8,4441.83 U35.3@2712.8,4409.45 v1(2712.8,4362.2) ; C243.1@2843.6,4458.66 2860.43,4441.83 U32.3@2860.43,4409.45 v1(2860.43,4362.2) ; C241.1@2993.11,4458.66 3008.07,4443.7 U29.3@3008.07,4409.45 v1(3008.07,4362.2) ; C249.1@3138.88,4458.66 3155.71,4441.83 U42.3@3155.71,4409.45 v1(3155.71,4362.2) ; C238.1@3286.52,4458.66 3303.35,4441.83 U30.3@3303.35,4409.45 v1(3303.35,4362.2) ; v1(3421.26,4362.2) 3437.01,4362.2 3450.98,4376.18 U36.3@3450.98,4409.45 3450.98,4441.83 C247.1@3434.15,4458.66 ; C239.1@3581.79,4458.66 3598.62,4441.83 U33.3@3598.62,4409.45 v1(3598.62,4362.2) ; C237.1@3729.43,4458.66 3746.26,4441.83 U39.3@3746.26,4409.45 v1(3746.26,4362.2) ; v2(7806.1,4247.05) C235.1@7806.1,4045.28 7806.1,4024.61 7821.06,4009.65 U44.3@7821.06,3976.38 ; v2(7885.83,4248.03) 7885.83,4208.66 8012.8,4081.69 C240.1@8012.8,4045.28 8012.8,4022.64 8027.76,4007.68 U46.3@8027.76,3976.38
  Bottom Layer w11.81: C134.1@7471.46,2543.31 7471.46,2692.05 C133.1@7488.07,2708.66 C133.1@7488.07,2712.6 ; R43.2@7889.76,2627.48 7922.76,2627.48 v1(7929.13,2633.86)
  Bottom Layer w12: C246.1@206.89,3556.84 223.61,3540.13 U43.3@223.61,3502.9 v1(223.61,3455.59)
  Bottom Layer w15.75: C251.1@5334.73,1142.12 5349.69,1157.08 U45.3@5417.41,1157.08 5417.41,1168.41 5519,1270 5856,1270 5890,1304 6097,1304 6123,1278 6170,1278 ; 6163,1278 6170,1285 ; U47.3@6473,1160.1 6413.16,1160.1 C253.1@6398.2,1145.14 6256.86,1145.14 6170,1232 6170,1366 6301,1497 6532,1497 6661.63,1626.63 7051.71,1626.63 7170.71,1745.62 8888.53,1745.62 v1(8901,1733.15) ; U9.6@7448.82,2876.77 7375.2,2876.77 7375.2,2713.78 7376.38,2712.6 7484.13,2712.6 C133.1@7488.07,2708.66 ; 8821,1745.62 8841.01,1765.63 R41.2@8841.01,1799.21
  Bottom Layer w19.68: C133.1@7470.37,2735.87 v2(7470.37,2771.3) ; C133.1@7509.74,2735.87 v2(7509.74,2771.3)
  Bottom Layer w25: U9.2@7653.54,2926.77 7710.44,2926.77 7728.24,2908.98 R57.2@7771.65,2908.98 7880.71,2908.98 7929.13,2860.56 v1(7929.13,2633.86)
  other v2: 7518.49,2867.5 7549.98,2867.5 7581.48,2867.5 7517.5,2899 7580.5,2899 7518.49,2930.5 7549.98,2930.5 7581.48,2930.5
16V5: C116.1 C132.1 C139.2 C143.1 C144.2 D5.2 LCD1.1 LCD1.42 LCD1.44 R63.2 TP8.1 U9.1 | length 8510.8
  Top Layer w7.87: LCD1.1@8448.82,1952.76 8496.06,1952.76 8503.94,1944.88 8539.37,1944.88 8570.87,1976.38 8570.87,2531.5 8543.31,2559.06 8543.31,2759.84 8519.69,2783.47 8500,2783.47 ; LCD1.42@8448.82,2759.84 8500,2759.84 8500,2783.47 ; LCD1.44@8448.82,2799.21 8500,2799.21 8500,2783.47
  Top Layer w11.81: v2(8248.03,2893.7) 8267.72,2874.02 8267.72,2822.84 8291.34,2799.21 LCD1.44@8448.82,2799.21 LCD1.44@8460.63,2799.21
  MidLayer1 w11.81: v2(8110.24,3397.64) 8145.67,3362.21 8161.42,3362.21 8248.03,3275.59 v2(8248.03,2893.7)
  MidLayer2 w11.81: v2(8110.24,3397.64) 8137.64,3425.04 8399.69,3425.04 8933.07,3958.43 v2(8933.07,4216.54)
  MidLayer4 w11.81: v2(8933.07,4216.54) 8933.07,4256.3 9233.96,4557.19 9721.96,4557.19 9998.36,4833.59 10120.44,4833.59 10450.19,5163.34 10450.19,5417.21 TP8.1@10514.94,5481.97
  Bottom Layer w12: R63.2@6546.77,2744.1 6641.62,2744.1 6694.6,2797.08 6694.6,2820.87 ; 6641.72,2873.75 6641.73,2889.76
  Bottom Layer w23.62: C144.2@6385.83,2744.1 6385.83,2804.76 6425.35,2844.29 6425.35,2885.83 ; 6641.73,2889.76 6783.46,3031.5 7524.41,3031.5 7579.13,2976.77 U9.1@7653.54,2976.77 7912.99,2976.77 7996.06,2893.7 v2(8248.03,2893.7)
  Bottom Layer w40: C116.1@5952.76,2885.83 6629.64,2885.83 6694.6,2820.87 D5.2@6775.59,2820.87
-7V5: C128.1 C129.2 D2.1 LCD1.6 R56.2 TP5.1 | length 7436.5
  Top Layer w15: v1(8389.76,2051.18) LCD1.6@8448.82,2051.18
  MidLayer1 w11.81: v2(8149.61,3452.76) 8216.54,3452.76 8417.32,3251.97 8417.32,2078.74 v1(8389.76,2051.18)
  MidLayer2 w11.81: v2(8149.61,3452.76) 8388.39,3452.76 8889.76,3954.13 v2(8889.76,4216.54)
  MidLayer2 w15: v2(7338.58,2897.64) 7338.58,2458.55 7745.95,2051.18 v1(8389.76,2051.18)
  MidLayer4 w11.81: v2(8889.76,4216.54) 8889.76,4251.97 9211.79,4574 9715,4574 9991.4,4850.4 10113.48,4850.4 10433.38,5170.3 10433.38,5500.4 TP5.1@10514.94,5581.97
  Bottom Layer w11.81: R56.2@6929.13,2924.73 6929.13,2954.07 6939.52,2964.46 C128.1@7019.8,2964.46 ; C128.1@7027.56,2952.76 C128.1@7031.5,2952.76 ; v1(8389.76,2051.18) C129.2@8389.76,2081.69
  Bottom Layer w15: C128.1@7029.53,2954.73 7078.74,2905.51 7330.71,2905.51 v2(7338.58,2897.64) ; D2.1@7183.07,2856.3 7183.07,2905.06
A3V3_USB: C272.2 C273.1 NT5.2 U52.3 | length 620.3
  Top Layer w10: U52.3@8108.27,5201.38 v1(8108.27,5234.25)
  Bottom Layer w19.68: C272.2@8110.68,5193.1 8108.27,5195.51 v1(8108.27,5234.25) 8190.75,5234.25 8370.93,5054.07 C273.1@8470.68,5054.07 NT5.2@8578.93,5054.07
AC16V: C131.1 D5.1 L1.2 U11.1 | length 1561.4
  Bottom Layer w15.75: L1.2@6177.17,2681.1 L1.2@6181.1,2677.17
  Bottom Layer w19.68: D5.1@6775.59,2657.48 6858.27,2657.48 6889.76,2625.99 7236.22,2625.99 7283.46,2673.23 C131.1@7283.46,2722.44 C131.1@7283.46,2724.41
  Bottom Layer w30: L1.2@6181.1,2677.17 6377.95,2677.17 6385.83,2669.29 U11.1@6385.9,2647
  Bottom Layer w40: L1.2@6182.3,2481.2 6183.18,2480.32 6712.6,2480.32 6775.59,2543.31 D5.1@6775.59,2657.48
AD.AIN0: C5.1 HDR7.9 TS1.6 U1.1 | length 3067.2
  MidLayer2 w7.87: HDR7.9@8868.5,616.54 8868.5,548.82 8964.57,452.76 9037.91,452.76 TS1.6@9190.67,300
  MidLayer4 w7.87: v1(8270.97,1228.01) 8300.13,1198.85 8300.13,981.87 8483.87,798.13 8768.71,798.13 8826,740.83 8826,659.04 HDR7.9@8868.5,616.54
  Bottom Layer w7.87: U1.1@7695.65,1530.45 U1.1@7704.65,1530.45 7890.85,1530.45 7999.67,1421.62 8559.58,1421.62 8624.87,1356.33 8624.87,1229.96 8597.17,1202.26 8517.99,1202.26 8497.02,1223.23 8413.23,1223.23 8395,1205 8293.98,1205 v1(8270.97,1228.01) v1@8270.97,1229 ; C5.1@8270.97,1256.86 v1@8270.97,1229 ; v1@8271.46,1228.51 v1@8270.97,1229
AD.AIN1: C6.1 HDR7.10 TS1.7 U1.2 | length 2976.3
  MidLayer2 w7.87: HDR7.10@8868.5,716.54 8918.5,666.54 8918.5,553.94 8996.06,476.38 9114.29,476.38 TS1.7@9290.67,300
  MidLayer4 w7.87: v1(8370.97,1228.01) 8313,1170.04 8313,992 8494,811 8774.04,811 HDR7.10@8868.5,716.54
  Bottom Layer w7.87: U1.2@7695.65,1504.86 U1.2@7704.65,1504.86 7898.23,1504.86 7994.34,1408.75 8554.25,1408.75 8612,1351 8612,1235.29 8591.84,1215.14 8523.33,1215.14 8502.36,1236.11 8407.9,1236.11 8399.8,1228.01 v1(8370.97,1228.01) C6.1@8370.97,1256.86
AD.AIN2: C7.1 HDR7.11 TS1.8 U1.3 | length 2702.5
  MidLayer2 w7.87: HDR7.11@8968.5,616.54 8968.5,559.06 9027.56,500 9190.67,500 TS1.8@9390.67,300
  MidLayer4 w7.87: v1(8499.81,1256.86) 8715.5,1041.17 8715.5,951.33 8919,747.83 8919,666.04 HDR7.11@8968.5,616.54
  Bottom Layer w7.87: U1.3@7695.65,1479.27 U1.3@7704.65,1479.27 7905.62,1479.27 7989.01,1395.87 8546.13,1395.87 8599,1343 ; C7.1@8470.97,1256.86 v1(8499.81,1256.86) 8528.66,1228.01 8586.51,1228.01 8599.13,1240.63 8599.13,1266.25 ; 8548.92,1395.87 8599,1345.79 8599,1343 ; 8599,1266.25 8599,1343
AD.AIN3: C8.1 HDR7.12 JP1.1 TS1.9 U1.4 | length 3673.9
  MidLayer2 w7.87: JP1.1@8385.83,251.97 8452.76,185.04 9375.71,185.04 TS1.9@9490.67,300 9310.69,479.98 ; HDR7.12@8968.5,716.54 9019.69,665.36 9019.69,562.99 9059.06,523.62 9267.72,523.62 9311.02,480.32
  MidLayer4 w7.87: v1(8542.12,1256.86) 8735,1063.98 8735,950.04 HDR7.12@8968.5,716.54
  Bottom Layer w7.87: U1.4@7695.65,1453.68 U1.4@7704.65,1453.68 7913,1453.68 7983.68,1383 8527,1383 8542.12,1367.88 v1(8542.12,1256.86) C8.1@8570.97,1256.86
AD.AOUT0: HDR7.5 TS1.2 U4.7 | length 2024.8
  MidLayer1 w7.87: HDR7.5@8668.5,616.54 8668.5,496.85 8715.95,449.4 8766.35,449.4 8790.67,425.08 TS1.2@8790.67,300
  Bottom Layer w7.87: U4.7@7736.23,1359.06 7694.48,1359.06 7665.94,1330.53 7665.94,1052.93 7890.89,827.98 8602.44,827.98 8621.04,809.38 8621.04,664 HDR7.5@8668.5,616.54
AD.AOUT1: HDR7.6 TS1.3 U4.8 | length 2052.1
  MidLayer1 w7.87: HDR7.6@8668.5,716.54 8719.57,665.47 8719.57,519.69 8762.87,476.38 8839.37,476.38 8890.67,425.08 TS1.3@8890.67,300
  Bottom Layer w7.87: U4.8@7736.23,1339.38 7693,1339.38 7678.82,1325.2 7678.82,1058.26 7896.22,840.86 8607.77,840.86 8633.91,814.71 8633.91,751.13 HDR7.6@8668.5,716.54
AD.AOUT2: HDR7.7 TS1.4 U4.9 | length 2078.9
  MidLayer1 w7.87: HDR7.7@8768.5,616.54 8768.5,551.18 8803.94,515.75 8900,515.75 8990.67,425.08 TS1.4@8990.67,300
  Bottom Layer w7.87: U4.9@7736.23,1319.69 7691.69,1319.69 7691.69,1063.6 7901.56,853.73 8613.1,853.73 8722,744.83 8722,657 8762.46,616.54 HDR7.7@8768.5,616.54
AD.AOUT3: HDR7.8 TS1.5 U4.10 | length 2089.8
  MidLayer1 w7.87: HDR7.8@8768.5,716.54 8817.99,667.05 8817.99,572.68 8843.43,547.24 8968.5,547.24 9090.67,425.08 TS1.5@9090.67,300
  Bottom Layer w7.87: U4.10@7736.23,1300.01 7715.01,1300.01 7704.57,1289.57 7704.57,1068.93 7906.89,866.61 8618.43,866.61 HDR7.8@8768.5,716.54
AD.I2C.SCL: EXTHDR1.25 EXTHDR2.25 EXTHDR3.25 HDR7.3 HDR_B1.5 R6.2 R8.1 | length 15408.7
  Top Layer w5: v1(6551.18,1244.1) HDR_B1.5@6551.18,1318.9
  Top Layer w7.87: v1(1614.17,3007.87) EXTHDR1.25@1614.17,3086.61 ; v1(3307.09,3271.65) EXTHDR3.25@3307.09,3409.45 ; v1(4094.49,3007.87) EXTHDR2.25@4094.49,3086.61
  MidLayer2 w5: v1(4094.49,3007.87) 4094.49,3027.56 4086.61,3035.43 4051.18,3035.43 4043.31,3027.56 4043.31,3003.94 3980.32,2940.95 3456.69,2940.95 3401.57,2996.06 3401.57,3244.1 3350.39,3295.28 3330.71,3295.28 v1(3307.09,3271.65) 2846.46,3271.65 2724.41,3149.61 2232.28,3149.61 2106.3,3023.62 1629.92,3023.62 v1(1614.17,3007.87) 1578.74,3043.31 1220.47,3043.31 1204.72,3027.56 1204.72,2948.82 1250.09,2903.45 2202.93,2903.45 2295.36,2811.02 2870.08,2811.02 2897.64,2838.58 4507.87,2838.58 4523.62,2822.84 4673.23,2822.84 4775.59,2925.2 5196.85,2925.2 5397.64,3125.98 5397.64,3188.98 5429.13,3220.47 5744.09,3220.47 5846.46,3118.11 5846.46,1610.24 5893.7,1562.99 6181.1,1562.99 6314.96,1429.13 6452.76,1429.13 6466.68,1415.21 6466.68,1226.23 6476.38,1216.54 6543.31,1216.54 6551.18,1224.41 v1(6551.18,1244.1) 7736.47,1244.1 7777,1203.57 7777,909 7815.92,870.08 8519.69,870.08 8627,977.39 8627,1319.86 8635.21,1328.06 8719,1328.06 8726,1321.06 8726,1167 8816,1077 8816,809.14 8779.86,773 8568.4,773 8531.2,735.8 8531.2,653.84 HDR7.3@8568.5,616.54
  Bottom Layer w5: v4(7777,1131) 7777,1221 7807.8,1251.8 R8.1@7842.6,1251.8
  Bottom Layer w7.87: R6.2@8670.97,1299.22 v1(8670.97,1328.06)